# Altium PCB K210-01-(B049) 3C1A-140W(SD3934+SD59D31+SD59D31+SP1232FL) 外挂FTF屏1.3寸-V3-协议板.PcbDoc (part 1 of 2)
Units mm, origin at the board's own origin, x right, y up, seen from the top; angles counter-clockwise.
Board outline 62.01 x 27.28 mm, 4 copper layers (Top Layer, Mid-Layer 1, Mid-Layer 2, Bottom Layer); 105 components, 215 nets, 394 pads, 722 vias.
Unrouted connection lines stored in the file: 2.
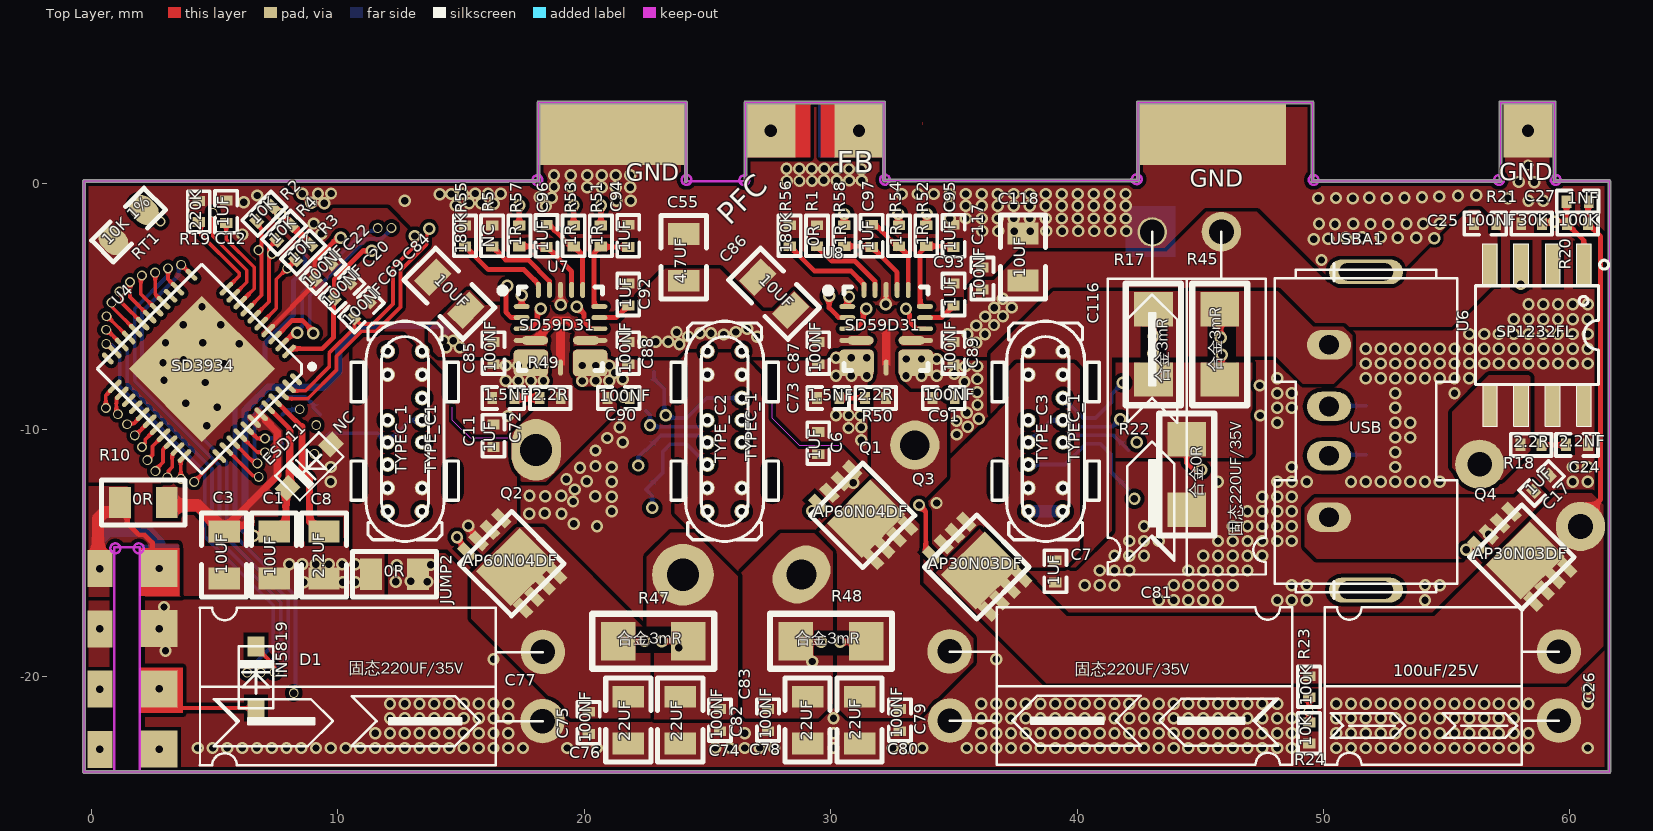
[diagram p0: Top Layer view]
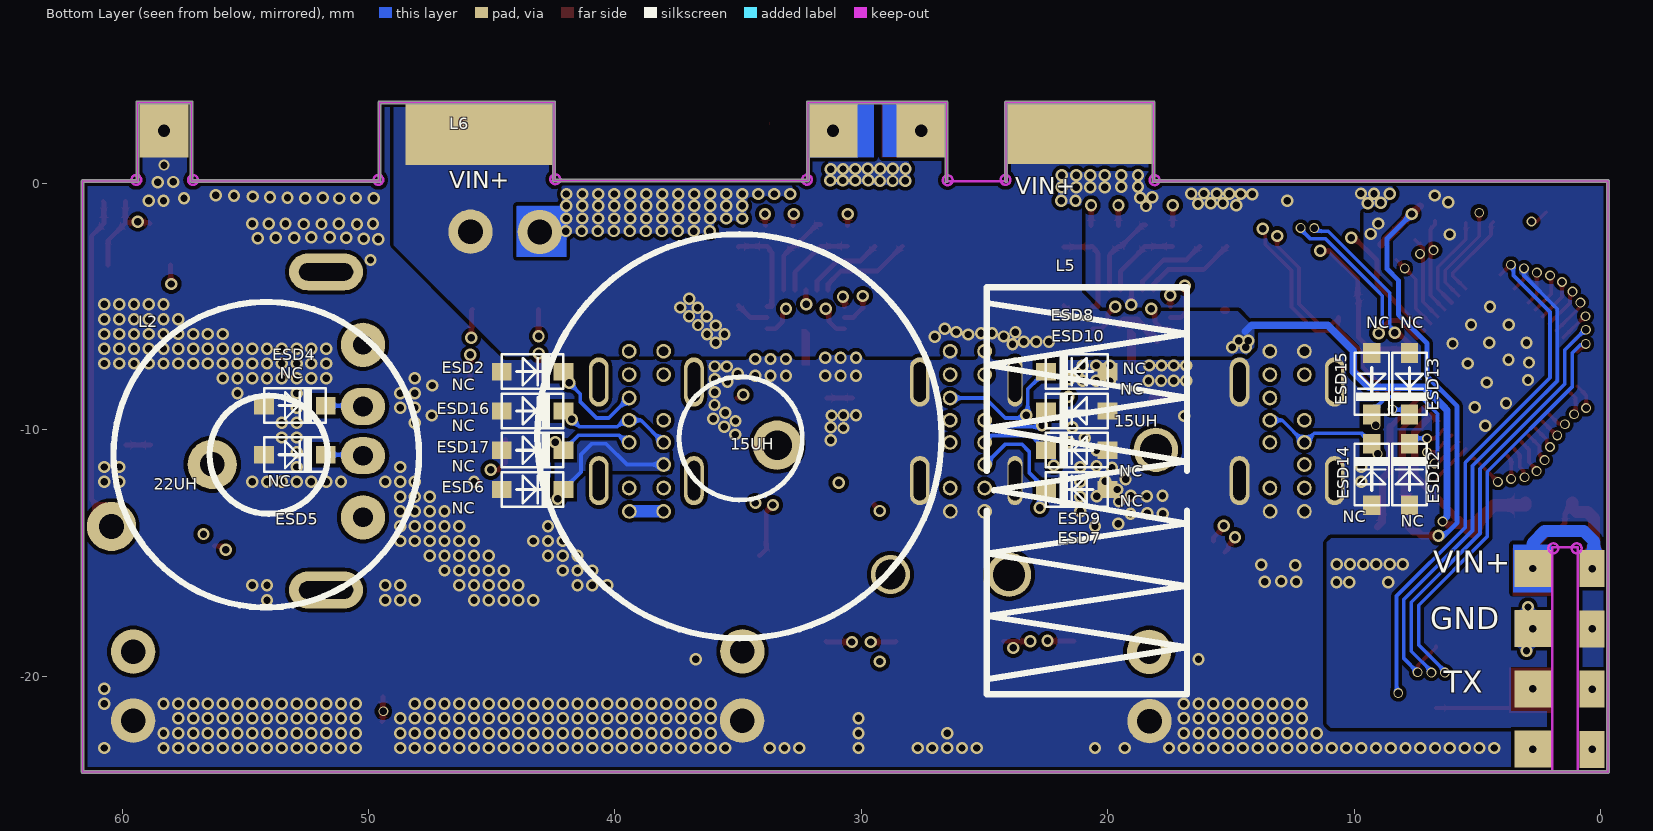
[diagram p1: Bottom Layer view, seen from below]
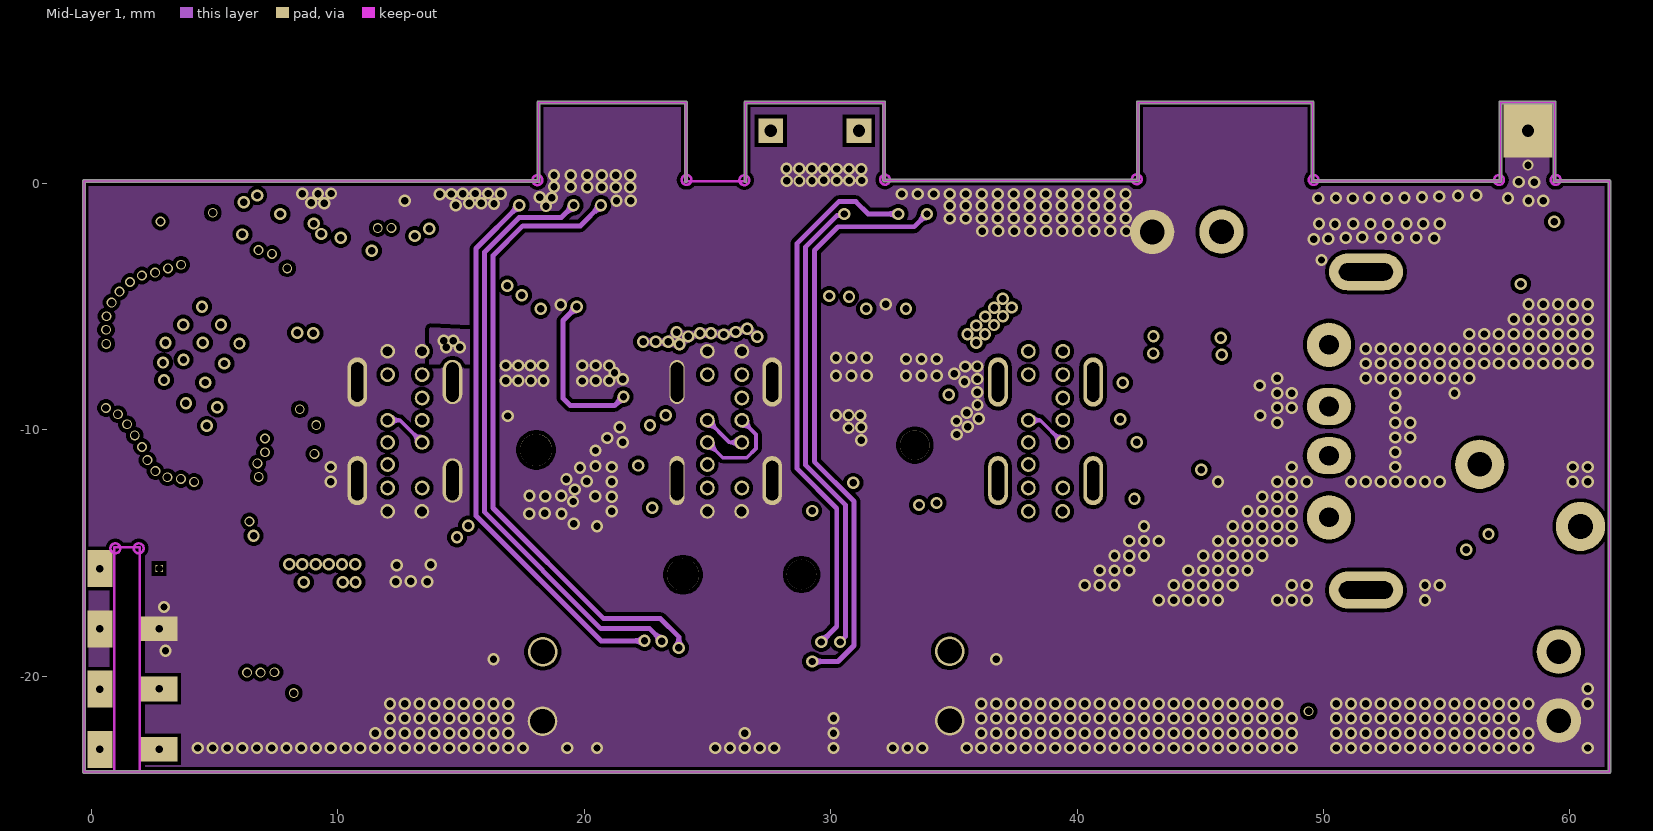
[diagram p2: Mid-Layer 1]
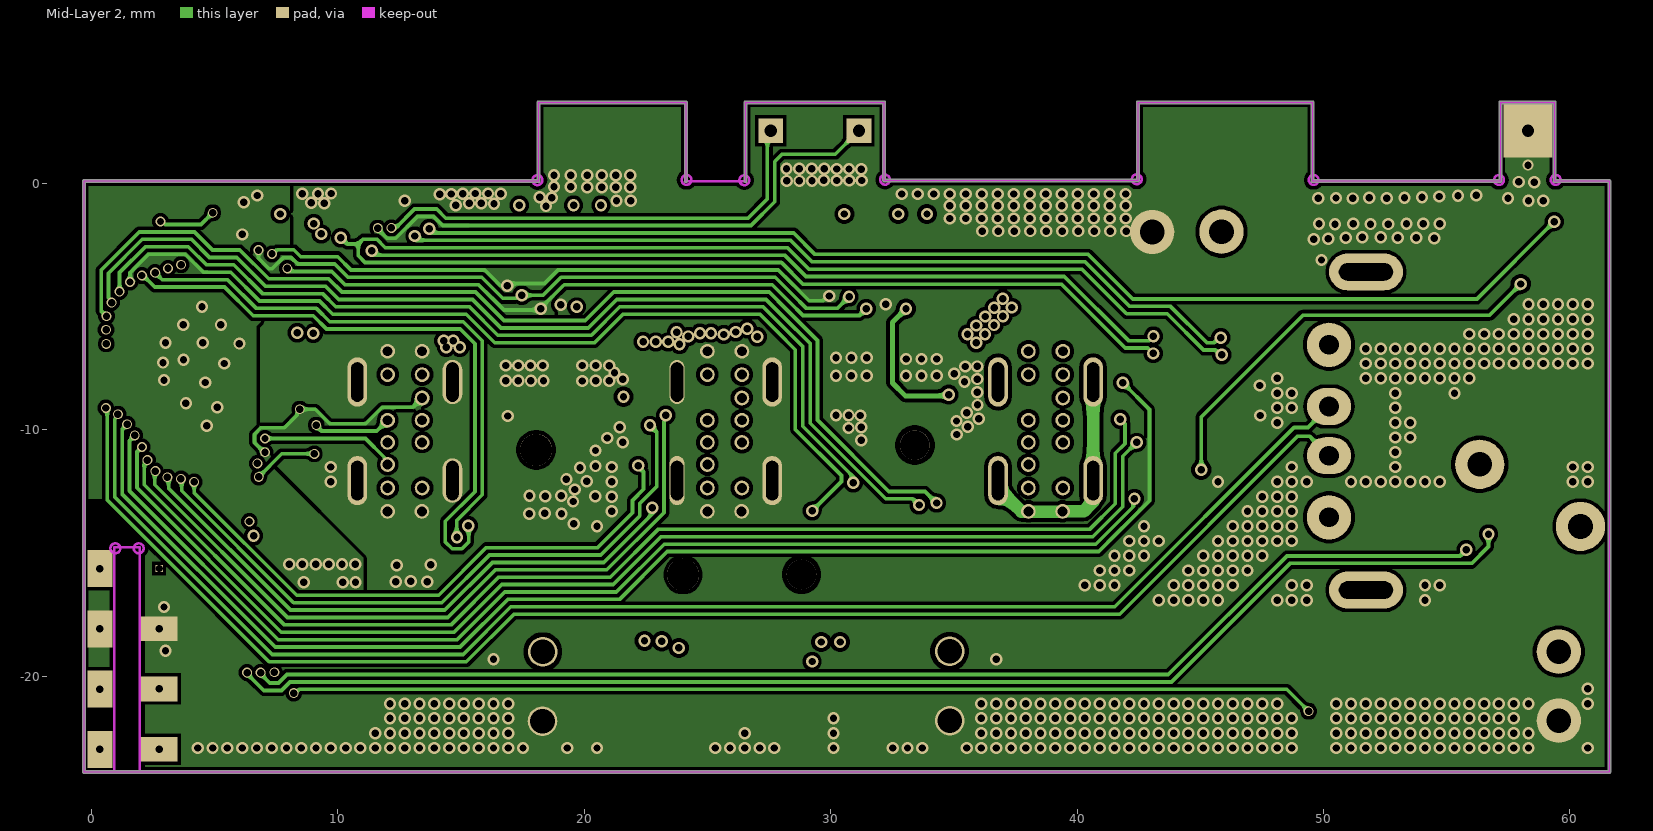
[diagram p3: Mid-Layer 2]

## Layer stack, top to bottom
Top Solder: solder mask 0.0102, Solder Resist, Dk 3.5
Top Layer: signal copper 0.0356
Dielectric 1: dielectric 0.32, FR-4, Dk 4.8
Mid-Layer 1: signal copper 0.0356
Dielectric2: dielectric 0.32, FR-4, Dk 4.8
Mid-Layer 2: signal copper 0.0356
Dielectric3: dielectric 0.32, FR-4, Dk 4.8
Bottom Layer: signal copper 0.0356
Bottom Solder: solder mask 0.0102, Solder Resist, Dk 3.5

## Board outline
-0.351,-22.405 cw(c-0.306,-22.382) -0.356,-22.382 -0.356,-15.199 cw(c-0.306,-15.199) -0.351,-15.177 -0.351,0.082 cw(c-0.3,0.082) -0.3,0.132 18.099,0.132 18.099,3.282 cw(c18.15,3.282) 18.15,3.332 24.125,3.332 cw(c24.125,3.282) 24.175,3.282 24.175,0.082 cw(c24.125,0.082) 24.074,0.082 24.074,3.231 18.2,3.231 18.2,0.082 cw(c18.15,0.082) 18.15,0.031 -0.25,0.031 -0.25,-23.843 61.549,-23.843 61.549,0.031 59.375,0.031 cw(c59.375,0.082) 59.324,0.082 59.324,3.231 57.225,3.231 57.225,0.082 cw(c57.175,0.082) 57.175,0.031 49.55,0.031 cw(c49.55,0.082) 49.499,0.082 49.499,3.231 42.525,3.231 42.525,0.107 cw(c42.475,0.107) 42.475,0.056 32.175,0.056 cw(c32.175,0.107) 32.124,0.107 32.124,3.231 26.6,3.231 26.6,0.082 cw(c26.55,0.082) 26.499,0.082 26.499,3.282 cw(c26.55,3.282) 26.55,3.332 32.175,3.332 cw(c32.175,3.282) 32.225,3.282 32.225,0.157 42.424,0.157 42.424,3.282 cw(c42.475,3.282) 42.475,3.332 49.55,3.332 cw(c49.55,3.282) 49.6,3.282 49.6,0.132 57.124,0.132 57.124,3.282 cw(c57.175,3.282) 57.175,3.332 59.375,3.332 cw(c59.375,3.282) 59.425,3.282 59.425,0.132 61.6,0.132 cw(c61.6,0.082) 61.65,0.082 61.65,-23.893 cw(c61.6,-23.893) 61.6,-23.944 -0.3,-23.944 cw(c-0.3,-23.893) -0.351,-23.893
cut-out: 0.925,-23.893 1.975,-23.893 1.975,-14.768 0.925,-14.768

## Design rules (kind name [scope] priority, off if disabled: settings)
Clearance [All] p1: gap=0.15 ignorepadtopadclearanceinfootprint=FALSE
ComponentClearance [All] p1: gap=0.05 collisioncheckmode=3 verticalgap=0.05 showdistances=FALSE
PlaneConnect [All] p1: planeconnectstyle=Direct reliefexpansion=0.508 reliefentries=4 reliefconductorwidth=0.254 reliefairgap=0.254
PolygonConnect [All] p1: connectstyle=Direct reliefconductorwidth=0.254 reliefentries=4 polygonreliefangle="90 Angle" airgapwidth=0.254
RoutingVias [All] p1: holewidth=0.3 width=0.4 viastyle="Through Hole" minholewidth=0.3 minwidth=0.4 maxholewidth=0.3 maxwidth=0.4
SolderMaskExpansion [All] p1: expansion=0.102 istentingtop=FALSE
Width [All] p1: maxlimit=1 minlimit=0.1 preferedwidth=0.15 minimp=50.000000 maximp=50.000000 favimp=50.000000
28 further rules are at their usual default settings.

## Classes and differential pairs
component class "B049-140W-3C1A 外挂FTF屏1.3寸": C1 C3 C6 C7 C8 C11 C12 C17 C20 C22 C24 C25 C26 C55 C69 C72 C73 C74 C75 C76 C77 C78 C79 C80 C81 C82 C83 C84 C85 C86 C87 C88 C89 C90 C91 C92 C93 C94 C95 C96 C97 C116 C117 C118 D1 ESD2 ESD4 ESD5 ESD6 ESD7 ESD8 ESD9 ESD10 ESD11 ESD12 ESD13 ESD14 ESD15 ESD16 ESD17 JUMP2 L2 L6 Q1 Q2 Q3 Q4 R1 R2 R3 R4 R5 R10 R17 R18 R19 R20 R21 R22 R45 R47 R48 R49 R50 R51 R52 R53 R54 R55 R56 R57 R58 RT1 TYPE_C2 TYPE_C3 U6 U7 U8 USBA1

## Components (designator, comment, footprint, x,y, rotation, side; value= is the part's Value field where it differs from the comment)
C1 "10UF" "C 0805_L" 7.42,-15.09 r90 top
C3 "10UF" "C 0805_L" 5.39,-15.09 r90 top
C6 "1UF" "C 0402_L" 29.5,-10.55 r270 top
C7 "1UF" "C 0402_L" 39.12,-15.75 r90 top
C8 "2.2UF" "C 0805_L" 9.44,-15.09 r90 top
C11 "1UF" "C 0402_L" 16.32,-10.25 r270 top
C12 "1UF" "C 0402_L" 5.47,-1.16 r270 top
C17 "1UF" "C 0402_L" 58.85,-12.18 r225 top
C20 "100NF" "C 0402_L" 10.176,-4.363 r45 top
C22 "100NF" "C 0402_L" 9.397,-3.583 r45 top
C24 "2.2NF" "C 0402_L" 60.29,-10.62 r180 top
C25 "100NF" "C 0402_L" 56.565,-1.643 r180 top
C26 "100uF/25V" 6*8W 59.55,-21.81 r180 top
C27 "1NF" "C 0402_L" 60.315,-0.75 r180 top (schematic designator C25)
C55 "4.7UF" "C 0805_L" 24.04,-3.01 r90 top
C69 "100NF" "C 0402_L" 10.96,-5.14 r45 top
C72 "1.5NF" "C 0402_L" 16.718,-8.718 r0 top
C73 "1.5NF" "C 0402_L" 29.9,-8.718 r0 top
C74 "22UF" "C 0805_L" 23.9,-21.79 r90 top
C75 "100NF" "C 0402_L" 20.18,-21.9 r90 top
C76 "22UF" "C 0805_L" 21.79,-21.79 r90 top
C77 "固态220UF/35V" 6*12W#1 16.41,-23.63 r180 top
C78 "22UF" "C 0805_L" 29.07,-21.79 r90 top
C79 "100NF" "C 0402_L" 32.81,-21.79 r90 top
C80 "22UF" "C 0805_L" 31.18,-21.79 r90 top
C81 "固态220UF/35V" 6*12W#2 36.74,-23.61 r0 top
C82 "100NF" "C 0402_L" 25.51,-21.79 r90 top
C83 "100NF" "C 0402_L" 27.46,-21.79 r90 top
C84 "10UF" "C 0805_L" 14.528,-4.488 r315 top
C85 "100NF" "C 0402_L" 16.318,-6.898 r90 top
C86 "10UF" "C 0805_L" 27.71,-4.488 r315 top
C87 "100NF" "C 0402_L" 29.5,-6.898 r90 top
C88 "100NF" "C 0402_L" 21.788,-6.898 r90 top
C89 "100NF" "C 0402_L" 34.99,-6.898 r90 top
C90 "100NF" "C 0402_L" 21.397,-8.718 r180 top
C91 "100NF" "C 0402_L" 34.59,-8.718 r180 top
C92 "1UF" "C 0402_L" 21.788,-4.519 r90 top
C93 "1UF" "C 0402_L" 34.99,-4.519 r90 top
C94 "1UF" "C 0402_L" 21.788,-2.14 r90 top
C95 "1UF" "C 0402_L" 34.99,-2.135 r90 top
C96 "1UF" "C 0402_L" 18.472,-2.14 r90 top
C97 "1UF" "C 0402_L" 31.665,-2.135 r90 top
C116 "固态220UF/35V" 6*12W#3 41.25,-3.88 r270 top locked
C117 "100NF" "C 0402_L" 36.16,-3.87 r270 top
C118 "10UF" "C 0805_L" 37.81,-3 r270 top
D1 "IN5819" SOD-323 6.68,-20.15 r90 top
ESD2 "NC" SOD-323 43.44,-7.65 r180 bottom
ESD4 "NC" SOD-323 53.09,-9.03 r180 bottom
ESD5 "NC" SOD-323 53.09,-11.02 r180 bottom
ESD6 "NC" SOD-323 43.44,-12.43 r180 bottom
ESD7 "NC" SOD-323 21.16,-12.43 r0 bottom
ESD8 "NC" SOD-323 21.16,-7.65 r0 bottom
ESD9 "NC" SOD-323 21.16,-10.837 r0 bottom
ESD10 "NC" SOD-323 21.16,-9.243 r0 bottom
ESD11 "NC" SOD-323 8.92,-11.42 r225 top
ESD12 "NC" SOD-323 7.76,-11.92 r90 bottom
ESD13 "NC" SOD-323 7.76,-8.04 r270 bottom
ESD14 "NC" SOD-323 9.29,-11.92 r90 bottom
ESD15 "NC" SOD-323 9.29,-8.04 r270 bottom
ESD16 "NC" SOD-323 43.44,-9.243 r180 bottom
ESD17 "NC" SOD-323 43.44,-10.837 r180 bottom
JUMP2 "0R" "R 0805_L" 12.3,-15.87 r0 top
L2 "22UH" 040125 54.05,-11.018 r270 bottom locked
L5 "15UH" IND-TH_L16.5-W8.5-P11.00-D1.0 20.85,-12.48 r180 bottom
L6 "15UH" 050125 34.95,-10.268 r225 bottom locked
Q1 "AP60N04DF" DFN3*3 31.511,-13.514 r135 top
Q2 "AP60N04DF" DFN3*3 17.271,-15.474 r135 top
Q3 "AP30N03DF" DFN3*3 36.143,-15.612 r135 top
Q4 "AP30N03DF" DFN3*3 58.264,-15.211 r135 top
R1 "0R" "R 0402_L" 29.448,-2.16 r90 top
R2 "10K" "R 0402_L" 7.04,-1.22 r225 top
R3 "10K" "R 0402_L" 8.62,-2.79 r225 top
R4 "10K" "R 0402_L" 7.84,-1.99 r225 top
R5 "NC" "R 0402_L" 16.267,-2.165 r90 top
R10 "0R" "R 0805_L" 2.11,-12.96 r0 top
R17 "合金3mR" "R 1206_L" 43.1,-6.518 r270 top
R18 "2.2R" "R 0402_L" 58.4,-10.62 r0 top
R19 "220K" "R 0402_L" 4.36,-1.13 r270 top
R20 "100K" "R 0402_L" 60.29,-1.643 r0 top
R21 "30K" "R 0402_L" 58.475,-1.643 r180 top
R22 "合金0R" "R 1206_L" 44.45,-11.85 r90 top
R23 "100K" "R 0402_L" 49.42,-20.41 r270 top (schematic designator R20)
R24 "10K" "R 0402_L" 49.42,-22.29 r270 top (schematic designator R21)
R45 "合金3mR" "R 1206_L" 45.79,-6.518 r270 top
R47 "合金3mR" "R 1206_L" 22.78,-18.59 r0 top
R48 "合金3mR" "R 1206_L" 30.04,-18.59 r180 top
R49 "2.2R" "R 0402_L" 18.648,-8.718 r180 top
R50 "2.2R" "R 0402_L" 31.85,-8.718 r180 top
R51 "1R" "R 0402_L" 20.678,-2.115 r270 top
R52 "1R" "R 0402_L" 33.882,-2.11 r270 top
R53 "1R" "R 0402_L" 19.575,-2.115 r270 top
R54 "1R" "R 0402_L" 32.773,-2.11 r270 top
R55 "180K" "R 0402_L" 15.164,-2.165 r90 top
R56 "180K" "R 0402_L" 28.34,-2.16 r90 top
R57 "1R" "R 0402_L" 17.37,-2.115 r270 top
R58 "1R" "R 0402_L" 30.557,-2.11 r270 top
RT1 "10K 1%" NTC1 1.54,-1.68 r225 top
TYPE_C1 "TYPEC_1" "TP-14pin 180°"#1 12.725,-10.07 r90 top locked
TYPE_C2 "TYPEC_1" "TP-14pin 180°"#2 25.7,-10.07 r90 top locked
TYPE_C3 "TYPEC_1" "TP-14pin 180°"#3 38.725,-10.07 r90 top locked
U4 "SD3934" QFN52L6*6 4.41,-8.28 r135 top
U6 "SP1232FL" SOP8 58.74,-6.19 r270 top
U7 "SD59D31" SD59D31_QFN16 19.088,-6.038 r180 top
U8 "SD59D31" SD59D31_QFN16 32.3,-6.038 r180 top
USBA1 "USB" "USB180 10mm" 51.725,-10.061 r270 top locked

## Footprints (in the part's own frame and the unit in brackets; to place one, negate y for a bottom-side part, rotate by r counter-clockwise, add the part's x,y. Pads: shape width x height; smd on the part's side, far side on the other; paste and mask are expansions set on the pad)
6*8W [mm]
  round 1.8 hole 1: 1(0,-2.8) 2(0,0)
  silkscreen extent 0,-4.6 9.5,1.8
6*12W#1 [mm]
  round 1.8 / inner round 1.2 / far side round 1.8 hole 1: 1(-1.91,-4.61) 2(-1.9,-1.8)
  silkscreen extent -1.91,-6.4 12,0
6*12W#2 [mm]
  round 1.8 / inner round 1.2 / far side round 1.8 hole 1: 1(-1.91,4.61) 2(-1.9,1.8)
  silkscreen extent -1.91,0 12,6.4
6*12W#3 [mm]
  round 1.6 / inner round 1.8 / far side round 1.8 hole 1: 1(-1.91,4.61)
  round 1.2 / inner round 1.8 / far side round 1.8 hole 1: 2(-1.9,1.8)
  silkscreen extent -1.91,0 12,6.4
040125 [mm]
  round 2 hole 1: 1(0.392,-2.29) 2(2.912,-6.38)
  silkscreen extent -6.2,-6.3 6.2,6.1
050125 [mm]
  round 2 / inner round 1.2 / far side round 2 hole 1.2: 1(1.338,0.826)
  round 1.6 / inner round 1.2 / far side oval 2.5x2 hole 1.2: 2(8.303,0.366)
  silkscreen extent -8.2,-8.2 8.2,8.2
"C 0402_L" [mm] "无极性贴片电容         淘宝ID:黄晶宝石"
  rect 0.4x0.5 smd: 1(-0.45,0) 2(0.45,0)
  silkscreen extent -0.85,-0.45 0.85,0.45, body extent -0.5,-0.26 0.5,0.26, height 0.53
"C 0805_L" [mil] "无极性贴片电容                                        淘宝ID:黄晶宝石"
  rect 35x50 smd: 1(-37.4,0) 2(37.4,0)
  silkscreen extent -67,-36 67,36, body extent -39,-24 39,24, height 20
DFN3*3 [mm]
  rect 0.8x0.4 smd: D(-1.425,-0.225) D(-1.425,-0.875) D(-1.425,0.425) D(-1.425,1.075) G(1.775,1.075) S(1.775,-0.875) S(1.775,0.425) S(1.775,-0.225)
  rect 2x2.5 smd: D(-0.025,0.125)
  silkscreen extent -1.33,-1.38 1.67,1.62, body extent -1.42,-1.43 1.78,1.67, height 0.8
IND-TH_L16.5-W8.5-P11.00-D1.0 [mm]
  round 1.8 / inner round 1.3 / far side round 2.5 hole 1.3: 1(-3.16,-3.41)
  round 1.8 / inner round 1.3 / far side oval 2x2.5 hole 1.3: 2(2.8,1.66)
  silkscreen extent -4.06,-8.25 4.06,8.25
NTC1 [mm]
  oval 1x1.3 smd: 1(-0.84,0) 2(0.91,0)
  silkscreen extent -1.47,-0.62 1.53,0.62
QFN52L6*6 [mm]
  rect 4.2x4.2 smd: 0(0.47,-0.58)
  oval 0.2x0.6 on Top Overlay: 1(-1.93,-3.58) 13(2.87,-3.58) 27(2.87,2.42) 39(-1.93,2.42)
  oval 0.2x0.7 smd: 2(-1.53,-3.58) 3(-1.13,-3.58) 4(-0.73,-3.58) 5(-0.33,-3.58) 6(0.07,-3.58) 7(0.47,-3.58) 8(0.87,-3.58) 9(1.27,-3.58) 10(1.67,-3.58) 11(2.07,-3.58) 28(2.47,2.42) 29(2.07,2.42) 30(1.67,2.42) 31(1.27,2.42) 32(0.87,2.42) 33(0.47,2.42) 34(0.07,2.42) 35(-0.33,2.42) 36(-0.73,2.42) 37(-1.13,2.42) 38(-1.53,2.42)
  oval 0.2x0.7 on Top Overlay: 12(2.47,-3.58)
  oval 0.6x0.2 smd: 14(3.47,-2.98) 26(3.47,1.82) 52(-2.53,-2.98)
  oval 0.7x0.2 on Top Overlay: 15(3.47,-2.58)
  oval 0.7x0.2 smd: 16(3.47,-2.18) 17(3.47,-1.78) 18(3.47,-1.38) 19(3.47,-0.98) 20(3.47,-0.58) 21(3.47,-0.18) 22(3.47,0.22) 23(3.47,0.62) 24(3.47,1.02) 25(3.47,1.42) 41(-2.53,1.42) 42(-2.53,1.02) 43(-2.53,0.62) 44(-2.53,0.22) 45(-2.53,-0.18) 46(-2.53,-0.58) 47(-2.53,-0.98) 48(-2.53,-1.38) 49(-2.53,-1.78) 50(-2.53,-2.18) 51(-2.53,-2.58)
  oval 0.6x0.2 on Top Overlay: 40(-2.53,1.82)
  silkscreen extent -2.73,-3.91 3.47,2.42, body extent -2.58,-3.58 3.42,2.42, height 0.9
"R 0402_L" [mm] "1/16W贴片电阻     淘宝ID:黄晶宝石"
  rect 0.4x0.5 smd: 1(-0.4,0) 2(0.45,0)
  silkscreen extent -0.8,-0.45 0.85,0.45, body extent -0.5,-0.25 0.5,0.25, height 0.3
"R 0805_L" [mil] "1/8W贴片电阻"
  rect 35x50 smd: 1(-37.4,0) 2(37.4,0)
  silkscreen extent -67,-36 67,36, body extent -39,-25 39,25, height 20
"R 1206_L" [mil] "1/4W贴片电阻"
  rect 55x62 smd: 1(-55.12,0) 2(57.09,0)
  silkscreen extent -96,-44 98,44, body extent -63,-31 63,32, height 22
SD59D31_QFN16 [mm]
  oval 0.65x0.2 smd: 1(1.623,-1.031) 2(1.623,-0.581) 3(1.623,-0.131) 4(1.623,0.344) 8(-1.527,0.344) 9(-1.527,-0.131) 10(-1.527,-0.581) 11(-1.527,-1.031)
  oval 1.075x0.35 smd: 4(1.089,0.344) 8(-0.994,0.344)
  rrect30% 1.4x1.075 smd: 5(1.248,1.254) 7(-1.152,1.254)
  oval 0.2x0.65 smd: 6(0.048,1.444) 12(-0.852,-1.706) 13(-0.402,-1.706) 14(0.048,-1.706) 15(0.498,-1.706) 16(0.948,-1.706)
  Top Layer region: 0.223,1.368 -0.127,1.368 -0.127,0.047 0.223,0.047
  Top Layer region: 0.223,0.047 0.058,-0.118 -0.127,-0.118 -0.127,0.047
  silkscreen extent -1.65,-1.83 2.52,1.57, body extent -1.48,-1.66 1.62,1.44, height 0.85
SOD-323 [mm]
  rect 0.8x0.7 smd: 1(-1.15,0) 2(1.35,0)
  silkscreen extent -1.15,-0.7 1.35,0.7, body extent -1.19,-0.65 1.41,0.65, height 1
SOP8 [mm]
  rect 1.7x0.6 smd: 1(-2.875,1.83) 2(-2.875,0.56) 3(-2.875,-0.71) 4(-2.875,-1.98) 5(2.825,-1.98) 6(2.825,-0.71) 7(2.825,0.56) 8(2.825,1.83)
  silkscreen extent -3.73,-2.58 3.68,2.83, body extent -3.01,-2.52 2.99,2.38, height 1.7
"TP-14pin 180°"#1 [mm]
  round 0.6 hole 0.4: A1(-3.25,0.7) A4(-2.3,0.7) A5(-1.35,0.7) A6(-0.45,0.7) A7(0.45,0.7) A9(2.3,0.7) A12(3.25,0.7) B1(3.25,-0.7) B4(2.3,-0.7) B5(1.35,-0.7) B6(0.45,-0.7) B7(-0.45,-0.7) B9(-2.3,-0.7) B12(-3.25,-0.69)
  oval 1.6x0.6 / inner oval 1.8x0.8 / far side oval 2x0.8 hole 0.5 slot 1.6 at 0 deg: ""(-2,-1.93) ""(2,-1.93)
  oval 1.6x0.6 / inner oval 2x0.8 / far side oval 2x0.8 hole 0.5 slot 1.6 at 0 deg: ""(-2,1.93) ""(2,1.93)
  silkscreen extent -4.46,-2.18 4.47,2.18, body extent -4.5,-1.98 4.5,2.02, height 10
"TP-14pin 180°"#2 [mm]
  round 0.6 hole 0.4: A1(-3.25,0.7) A4(-2.3,0.7) A5(-1.35,0.7) A6(-0.45,0.7) A7(0.45,0.7) A9(2.3,0.7) A12(3.25,0.7) B1(3.25,-0.7) B4(2.3,-0.7) B5(1.35,-0.7) B6(0.45,-0.7) B7(-0.45,-0.7) B9(-2.3,-0.7) B12(-3.25,-0.69)
  oval 1.6x0.6 / inner oval 2x0.8 / far side oval 2x0.8 hole 0.5 slot 1.6 at 0 deg: ""(-2,-1.93) ""(2,-1.93)
  oval 1.6x0.6 / inner oval 2x0.6 / far side oval 2x0.6 hole 0.5 slot 1.6 at 0 deg: ""(-2,1.93)
  oval 1.6x0.6 / inner oval 1.8x0.6 / far side oval 2x0.6 hole 0.5 slot 1.6 at 0 deg: ""(2,1.93)
  silkscreen extent -4.46,-2.18 4.47,2.18, body extent -4.5,-1.98 4.5,2.02, height 10
"TP-14pin 180°"#3 [mm]
  round 0.6 hole 0.4: A1(-3.25,0.7) A4(-2.3,0.7) A5(-1.35,0.7) A6(-0.45,0.7) A7(0.45,0.7) A9(2.3,0.7) A12(3.25,0.7) B1(3.25,-0.7) B4(2.3,-0.7) B5(1.35,-0.7) B6(0.45,-0.7) B7(-0.45,-0.7) B9(-2.3,-0.7) B12(-3.25,-0.69)
  oval 1.6x0.6 / inner oval 2x0.8 / far side oval 2x0.8 hole 0.5 slot 1.6 at 0 deg: ""(-2,-1.93) ""(-2,1.93) ""(2,-1.93) ""(2,1.93)
  silkscreen extent -4.46,-2.18 4.47,2.18, body extent -4.5,-1.98 4.5,2.02, height 10
"USB180 10mm" [mm]
  oval 1.2x1.8 / inner round 1.8 / far side round 1.8 hole 0.8: 1(3.5,-1.5) 4(-3.5,-1.5)
  oval 1.2x1.8 / inner oval 1.5x1.8 / far side oval 1.5x1.8 hole 0.8: 2(1,-1.5) 3(-1,-1.5)
  oval 1x3 / inner oval 1.5x3 / far side oval 1.5x3 hole 0.7 slot 2.2 at 90 deg: ""(-6.46,0) ""(6.45,0)
  silkscreen extent -6.8,-3.7 6.8,3.7, body extent -6.6,-3.02 6.6,2.98, height 10

## Part data
C1: library part C-CC, "贴片电容：10UF/10V-X5R-0805", PART NUMBER=003-, TOLERANCE=+-??%, VOLTAGE RATING=??V, LatestRevisionDate=17-Jul-2002, LatestRevisionNote="Re-released for DXP Platform.", PackageDescription="Radial Cap, Thru-Hole; 2 Leads; 0.3 in Pin Spacing", PackageReference=RAD-0.3, PART DESC="CERAMIC CAP", PCB DECAL=CCV5S, Published=8-Jun-2000, Publisher="Altium Limited"
C3: library part C-CC, "贴片电容：10UF/50V-X5R-0805", PART NUMBER=003-, TOLERANCE=+-??%, VOLTAGE RATING=??V, LatestRevisionDate=17-Jul-2002, LatestRevisionNote="Re-released for DXP Platform.", PackageDescription="Radial Cap, Thru-Hole; 2 Leads; 0.3 in Pin Spacing", PackageReference=RAD-0.3, PART DESC="CERAMIC CAP", PCB DECAL=CCV5S, Published=8-Jun-2000, Publisher="Altium Limited"
C6 C7 C11 C12 C17 C96 C97: library part C-CC, "贴片电容：1UF/50V-X7R-0402", PART NUMBER=003-, TOLERANCE=+-??%, VOLTAGE RATING=??V, PART DESC="CERAMIC CAP", PCB DECAL=CCV5S
  C6 C7 C11 C17 C96 C97: LatestRevisionDate=17-Jul-2002, LatestRevisionNote="Re-released for DXP Platform.", PackageDescription="Radial Cap, Thru-Hole; 2 Leads; 0.3 in Pin Spacing", PackageReference=RAD-0.3, Published=8-Jun-2000, Publisher="Altium Limited"
C8: library part C-CC, "贴片电容：2.2UF/10V-X5R-0805", PART NUMBER=003-, TOLERANCE=+-??%, VOLTAGE RATING=??V, LatestRevisionDate=17-Jul-2002, LatestRevisionNote="Re-released for DXP Platform.", PackageDescription="Radial Cap, Thru-Hole; 2 Leads; 0.3 in Pin Spacing", PackageReference=RAD-0.3, PART DESC="CERAMIC CAP", PCB DECAL=CCV5S, Published=8-Jun-2000, Publisher="Altium Limited"
C20 C22 C69 C85 C87 C88 C89 C90 C91 C117: library part C-CC, "贴片电容：100NF/50V-X7R-0402", PART NUMBER=003-, TOLERANCE=+-??%, VOLTAGE RATING=??V, PART DESC="CERAMIC CAP", PCB DECAL=CCV5S
  C20 C22 C69 C85 C87 C88 C89 C90 C91: LatestRevisionDate=17-Jul-2002, LatestRevisionNote="Re-released for DXP Platform.", PackageDescription="Radial Cap, Thru-Hole; 2 Leads; 0.3 in Pin Spacing", PackageReference=RAD-0.3, Published=8-Jun-2000, Publisher="Altium Limited"
C24: library part Cap, "贴片电容：2.2NF/50V-X7R-0402", LatestRevisionDate=17-Jul-2002, LatestRevisionNote="Re-released for DXP Platform.", PackageDescription="Radial Cap, Thru-Hole; 2 Leads; 0.3 in Pin Spacing", PackageReference=RAD-0.3, Published=8-Jun-2000, Publisher="Altium Limited"
C25: library part Cap, "贴片电容：100NF/50V-X7R-0402", LatestRevisionDate=17-Jul-2002, LatestRevisionNote="Re-released for DXP Platform.", PackageDescription="Radial Cap, Thru-Hole; 2 Leads; 0.3 in Pin Spacing", PackageReference=RAD-0.3, Published=8-Jun-2000, Publisher="Altium Limited"
C26: library part "Cap Pol2", "电解电容：100UF/25V 6.3*8mm", LatestRevisionDate=17-Jul-2002, LatestRevisionNote="Re-released for DXP Platform.", PackageDescription="Polarized Capacitor; 2 Leads", PackageReference=POLAR0.8, Published=8-Jun-2000, Publisher="Altium Limited"
C27: library part Cap, "贴片电容：1NF/50V-X7R-0402", LatestRevisionDate=17-Jul-2002, LatestRevisionNote="Re-released for DXP Platform.", PackageDescription="Radial Cap, Thru-Hole; 2 Leads; 0.3 in Pin Spacing", PackageReference=RAD-0.3, Published=8-Jun-2000, Publisher="Altium Limited"
C55: library part C-CC, "贴片电容：4.7UF/25V-X5R-0805", PART NUMBER=003-, TOLERANCE=+-??%, VOLTAGE RATING=??V, LatestRevisionDate=17-Jul-2002, LatestRevisionNote="Re-released for DXP Platform.", PackageDescription="Radial Cap, Thru-Hole; 2 Leads; 0.3 in Pin Spacing", PackageReference=RAD-0.3, PART DESC="CERAMIC CAP", PCB DECAL=CCV5S, Published=8-Jun-2000, Publisher="Altium Limited"
C72 C73: library part C-CC, "贴片电容：1.5NF/50V-X7R-0402", PART NUMBER=003-, TOLERANCE=+-??%, VOLTAGE RATING=??V, PART DESC="CERAMIC CAP", PCB DECAL=CCV5S
C74 C76 C78 C80: library part C-CC, "22UF/25V-X5R-0805", PART NUMBER=003-, TOLERANCE=+-??%, VOLTAGE RATING=??V, LatestRevisionDate=17-Jul-2002, LatestRevisionNote="Re-released for DXP Platform.", PackageDescription="Radial Cap, Thru-Hole; 2 Leads; 0.3 in Pin Spacing", PackageReference=RAD-0.3, PART DESC="CERAMIC CAP", PCB DECAL=CCV5S, Published=8-Jun-2000, Publisher="Altium Limited"
C75 C79 C82 C83: library part C-CC, "贴片电容：100NF/25V-X7R-0402", PART NUMBER=003-, TOLERANCE=+-??%, VOLTAGE RATING=??V, LatestRevisionDate=17-Jul-2002, LatestRevisionNote="Re-released for DXP Platform.", PackageDescription="Radial Cap, Thru-Hole; 2 Leads; 0.3 in Pin Spacing", PackageReference=RAD-0.3, PART DESC="CERAMIC CAP", PCB DECAL=CCV5S, Published=8-Jun-2000, Publisher="Altium Limited"
C77 C81 C116: library part C-CE, "插件固态电容：220UF/35V -6*12", PCB DECAL=CE6X11
C84 C86: library part C-CC, "贴片电容：10UF/25V-X7R-0805", PART NUMBER=003-, TOLERANCE=+-??%, VOLTAGE RATING=??V, LatestRevisionDate=17-Jul-2002, LatestRevisionNote="Re-released for DXP Platform.", PackageDescription="Radial Cap, Thru-Hole; 2 Leads; 0.3 in Pin Spacing", PackageReference=RAD-0.3, PART DESC="CERAMIC CAP", PCB DECAL=CCV5S, Published=8-Jun-2000, Publisher="Altium Limited"
C92 C93: library part C-CC, "贴片电容：1UF/10V-X7R-0402", PART NUMBER=003-, TOLERANCE=+-??%, VOLTAGE RATING=??V, LatestRevisionDate=17-Jul-2002, LatestRevisionNote="Re-released for DXP Platform.", PackageDescription="Radial Cap, Thru-Hole; 2 Leads; 0.3 in Pin Spacing", PackageReference=RAD-0.3, PART DESC="CERAMIC CAP", PCB DECAL=CCV5S, Published=8-Jun-2000, Publisher="Altium Limited"
C94 C95: library part C-CC, "贴片电容：1UF/25V-X7R-0402", PART NUMBER=003-, TOLERANCE=+-??%, VOLTAGE RATING=??V, LatestRevisionDate=17-Jul-2002, LatestRevisionNote="Re-released for DXP Platform.", PackageDescription="Radial Cap, Thru-Hole; 2 Leads; 0.3 in Pin Spacing", PackageReference=RAD-0.3, PART DESC="CERAMIC CAP", PCB DECAL=CCV5S, Published=8-Jun-2000, Publisher="Altium Limited"
C118: library part C-CC, "贴片电容：10UF/50V-X7R-0805", PART NUMBER=003-, TOLERANCE=+-??%, VOLTAGE RATING=??V, PART DESC="CERAMIC CAP", PCB DECAL=CCV5S
D1: library part D1
ESD2 ESD4 ESD5 ESD6 ESD7 ESD8 ESD9 ESD10 ESD11 ESD12 ESD13 ESD14 ESD15 ESD16 ESD17: library part ESD1
  ESD2 ESD6 ESD11 ESD16 ESD17: PCB DECAL=0603-CAP
  ESD4 ESD5 ESD7 ESD8 ESD9 ESD10 ESD12 ESD13 ESD14 ESD15: PCB DECAL=DIODE\SMD
JUMP2: library part J, "贴片电阻：0R-0805-F", PCB DECAL=JP5
L2: library part L, "磁环电感：040125 22UH 0.7线径 立式加套管"
L6: library part IND-UPRIGHT, "磁环电感：050125-15UH-1.2线径卧套", Code_IEC=1005, Code_JEITA=0402, LatestRevisionDate=29-May-2009, LatestRevisionNote="IPC-7351 Footprint Added.", PackageDescription="Chip Inductor", PackageReference=0402-A, PCB DECAL=FC5T5A, Published=8-Jun-2000, Publisher="Altium Limited"
Q1 Q2: library part NMOS, "贴片MOS:AP60N04DF-3*3", PCB DECAL=DFN5_6
Q3 Q4: library part NMOS, "贴片MOS:AP30N03DF-3*3", PCB DECAL=DFN5_6
R1: library part RES, "贴片电阻：0R-0402-F", Manufacturer="Generic Components", Class=Passive, PCB DECAL=0603-RES, Published=08/06/2000, Publisher="Altium Hobart Technology Centre", SubClass=Resistor
R2 R3 R4: library part RES, "贴片电阻：10K-0402-F", Manufacturer="Generic Components", Class=Passive, PCB DECAL=0603-RES, Published=08/06/2000, Publisher="Altium Hobart Technology Centre", SubClass=Resistor
R5: library part RES, Manufacturer="Generic Components", Class=Passive, PCB DECAL=0603-RES, Published=08/06/2000, Publisher="Altium Hobart Technology Centre", SubClass=Resistor
R10: library part RES, "贴片电阻：0R-0805-F", Manufacturer="Generic Components", Class=Passive, PCB DECAL=0603-RES, Published=08/06/2000, Publisher="Altium Hobart Technology Centre", SubClass=Resistor
R17 R45 R47 R48: library part RES, "贴片合金电阻：3mR-1206-F", Manufacturer="Generic Components", Class=Passive, PCB DECAL=0603-RES, Published=08/06/2000, Publisher="Altium Hobart Technology Centre", SubClass=Resistor
R18: library part Res1, "贴片电阻：2.2R-0402-F", LatestRevisionDate=17-Jul-2002, LatestRevisionNote="Re-released for DXP Platform.", PackageDescription="Axial Device, Thru-Hole; 2 Leads; 0.3 in Pin Spacing", PackageReference=AXIAL-0.3, Published=8-Jun-2000, Publisher="Altium Limited"
R19: library part RES, "贴片电阻：220K-0402-F", Manufacturer="Generic Components", Class=Passive, PCB DECAL=0603-RES, Published=08/06/2000, Publisher="Altium Hobart Technology Centre", SubClass=Resistor
R20 R23: library part Res1, "贴片电阻：100K-0402-F", LatestRevisionDate=17-Jul-2002, LatestRevisionNote="Re-released for DXP Platform.", PackageDescription="Axial Device, Thru-Hole; 2 Leads; 0.3 in Pin Spacing", PackageReference=AXIAL-0.3, Published=8-Jun-2000, Publisher="Altium Limited"
R21: library part Res1, "贴片电阻：30K-0402-F", LatestRevisionDate=17-Jul-2002, LatestRevisionNote="Re-released for DXP Platform.", PackageDescription="Axial Device, Thru-Hole; 2 Leads; 0.3 in Pin Spacing", PackageReference=AXIAL-0.3, Published=8-Jun-2000, Publisher="Altium Limited"
R22: library part Res1, "贴片电阻：合金0R-1206-F", LatestRevisionDate=17-Jul-2002, LatestRevisionNote="Re-released for DXP Platform.", PackageDescription="Axial Device, Thru-Hole; 2 Leads; 0.3 in Pin Spacing", PackageReference=AXIAL-0.3, Published=8-Jun-2000, Publisher="Altium Limited"
R24: library part Res1, "贴片电阻：10K-0402-F", LatestRevisionDate=17-Jul-2002, LatestRevisionNote="Re-released for DXP Platform.", PackageDescription="Axial Device, Thru-Hole; 2 Leads; 0.3 in Pin Spacing", PackageReference=AXIAL-0.3, Published=8-Jun-2000, Publisher="Altium Limited"
R49 R50: library part RES, "贴片电阻：2.2R-0402-F", Manufacturer="Generic Components", Class=Passive, PCB DECAL=0603-RES, Published=08/06/2000, Publisher="Altium Hobart Technology Centre", SubClass=Resistor
R51 R52 R53 R54 R57 R58: library part RES, "贴片电阻：1R-0402,+/-1% SMD", Manufacturer="Generic Components", Class=Passive, PCB DECAL=0603-RES, Published=08/06/2000, Publisher="Altium Hobart Technology Centre", SubClass=Resistor
R55 R56: library part RES, "贴片电阻：180K-0402-F", Manufacturer="Generic Components", Class=Passive, PCB DECAL=0603-RES, Published=08/06/2000, Publisher="Altium Hobart Technology Centre", SubClass=Resistor
RT1: library part RES-A, "插件NTC热敏电阻：10K 1% 3950 L：60mm", PCB DECAL=R.AI-6\1(1/8W)
U4: "贴片IC：SD3934-QFN52L6*6", PCB DECAL=QFN52-0.4
U6: library part SP1233FL, "贴片IC：SP1232F-SOP8"
U7 U8: library part SD59D31_QFN16, "贴片IC：SD59D31-QFN3x3_16", PCB DECAL=QFN16_3X3
TYPE_C1 TYPE_C2 TYPE_C3: PCB DECAL=TYPEC

## Free pads (board coordinates)
  rect 1x1.5 hole 0.3 mask+0.102: 2(0.35,-22.973) 2(0.35,-20.53) 2(0.35,-18.086) 2(0.35,-15.643)
  rect 1.5x1.5 / inner rect 1.5x1 / far side rect 1.5x1.5 hole 0.3 mask+0.102: 2(2.75,-22.968) 2(2.75,-20.524) 2(2.75,-18.08)
  rect 1.5x1.5 / inner rect 0.3x0.3 / far side rect 1.5x1.5 hole 0.3 mask+0.102: 2(2.75,-15.636)
  rect 2x2.2 / inner rect 1x1 / far side rect 2x2.2 hole 0.5 mask+0.102: 2(27.575,2.132) 2(31.15,2.132)
  rect 2x2.2 hole 0.5 mask+0.102: 2(58.3,2.132)
  rect 6x2.5 smd far side mask+0.102: GND(21.08,2.02) GND(45.51,1.99)
  rect 6x2.5 smd mask+0.102: GND(21.15,1.982) GND(45.475,1.982)

## Via types
v1: diameter 0.5, hole 0.3, Top Layer to Bottom Layer, tented both sides, 681 vias
v2: diameter 0.4, hole 0.3, Top Layer to Bottom Layer, tented both sides, 40 vias
v3: diameter 0.45, hole 0.3, Top Layer to Bottom Layer, tented both sides, 1 vias

## Nets (pads, with @x,y where several pads share a name; then routed paths per layer and width w, separated by ;. In a path a pad name is that pad's centre, name@x,y a point inside that pad or via, vN(x,y) a via of type N, cw(c..) or ccw(c..) an arc to the next point about the centre after c; other vN are vias at no path point)
AD1: R23.2 R24.1 U4.14 | length 63.9
  Top Layer w0.15: v2(3.642,-3.31) 3.655,-3.31 U4.14@4.063,-3.719
  Top Layer w0.2: R23.2@49.42,-20.86 49.42,-21.81 R24.1@49.46,-21.85
  Mid-Layer 2 w0.15: v2(8.213,-20.693) 8.281,-20.693 8.434,-20.54 48.508,-20.54 v2(49.399,-21.431)
  Bottom Layer w0.15: v2(3.642,-3.31) 3.538,-3.414 3.538,-3.746 2.06,-5.224 2.06,-7.9 5.5,-11.34 5.5,-13.97 8.286,-16.756 8.286,-20.62 v2(8.213,-20.693)
AGND: C1.1 C3.1 C8.1 C12.1 C20.2 C22.2 C69.2 JUMP2.1 R19.1 RT1.2 U4.0
  other v1: 8.62,-16.2 10.2,-16.2 10.72,-16.2 8.03,-15.465 8.566,-15.465 9.102,-15.465 9.638,-15.465 10.174,-15.465 10.71,-15.465 4.69,-9.85 5.11,-9.1 3.84,-8.93 4.62,-8.09 2.95,-7.99 5.4,-7.32 2.91,-7.28 3.74,-7.16 6.01,-6.51 3.01,-6.47 4.52,-6.47 3.73,-5.74 5.26,-5.74 4.49,-5.01 6.13,-2.08 9.33,-2.06 9.02,-1.64 6.19,-0.78 6.73,-0.5
BACK_LED: 
BOOT0: 
BST1: 
BST1-1: 
BST2: 
BST2-1.: 
BST3: 
BUTTON: 
CC1-1: 
CC1-2: 
CC1-3: 
CC1_1: 
CC1_2: 
CC1_3: 
CC1_4: 
CC2-1: 
CC2-2: 
CC2-3: 
CC2_1: 
CC2_2: 
CC2_3: 
CC2_4: 
COMP: 
COMP1: 
CSN: C22.1 R17.2 R22.2 R45.2 U4.5 U6.3 | length 99.2
  Top Layer w0.2: U4.5@7.174,-5.982 9.078,-4.078 C22.1@9.078,-3.901 9.078,-3.132 9.998,-2.212 v1(10.122,-2.212) ; v1(43.094,-6.91) 43.1,-6.916 R17.2@43.1,-7.968 ; R22.2@44.45,-10.4 44.45,-11.35 44.733,-11.633 v1(45.045,-11.633) ; R45.2@45.79,-7.968 45.876,-7.882 v1(45.876,-6.969) ; v1(58.01,-4.09) 58.03,-4.07 U6.3@58.03,-3.315
  Mid-Layer 2 w0.15: v1(10.122,-2.212) 10.13,-2.212 10.385,-2.467 10.838,-2.467 ; v1(43.094,-6.91) 42.874,-6.69 41.96,-6.69 39.37,-4.1 28.883,-4.1 28.003,-3.22 11.11,-3.22 10.838,-2.948 10.838,-2.467 ; v1(45.045,-11.633) 45.045,-9.485 49.169,-5.361 56.739,-5.361 v1(58.01,-4.09) ; v1(45.876,-6.969) 45.811,-6.969 45.613,-6.77 45.136,-6.77 43.666,-5.3 42.013,-5.3 40.203,-3.49 29.122,-3.49 28.252,-2.62 11.93,-2.62 11.58,-2.27 11.035,-2.27 10.838,-2.467
CSP2: C20.1 R17.1 TYPE_C3. TYPE_C3.A1 TYPE_C3.A12 TYPE_C3.B1 TYPE_C3.B12 U4.2 | length 51.8
  Top Layer w0.2: U4.2@8.023,-6.831 8.134,-6.72 9.368,-6.72 9.82,-6.268 9.82,-4.719 C20.1@9.858,-4.681 9.858,-4.539 9.823,-4.504 9.858,-4.469 9.858,-3.903 11.011,-2.75 11.378,-2.75 v1(11.383,-2.745) ; v1(43.1,-6.21) R17.1@43.1,-5.118
  Mid-Layer 2 w0.15: v1(11.383,-2.745) 11.558,-2.92 28.128,-2.92 28.998,-3.79 39.484,-3.79 42.084,-6.39 42.92,-6.39 v1(43.1,-6.21)
  Mid-Layer 2 w0.5: TYPE_C3.@36.795,-12.07 36.795,-12.385 37.74,-13.33 39.405,-13.33 TYPE_C3.B12@39.415,-13.32 40.27,-13.32 40.655,-12.935 TYPE_C3.@40.655,-12.07 TYPE_C3.@40.655,-8.07
  Bottom Layer w0.5: TYPE_C3.A1@38.025,-13.32 TYPE_C3.B12@39.415,-13.32
CSP3: C69.1 R45.1 U4.51 USBA1.4 | length 45.5
  Top Layer w0.15: U4.51@8.023,-8.245 8.208,-8.43 8.68,-8.43 9.65,-7.46 9.65,-6.897 10.68,-5.867 C69.1@10.68,-5.635 ; C69.1@10.642,-5.458 10.899,-5.715 11.43,-5.715 12.24,-4.905 12.24,-3.43 13.131,-2.539 v1(13.131,-2.145)
  Top Layer w0.2: C69.1@10.642,-5.458 10.642,-5.6 C69.1@10.677,-5.635 ; R45.1@45.79,-5.118 45.83,-5.158 v1(45.83,-6.27)
  Mid-Layer 2 w0.15: v1(13.131,-2.145) 13.306,-2.32 28.376,-2.32 29.246,-3.19 40.327,-3.19 42.137,-5 43.79,-5 45.26,-6.47 45.567,-6.47 45.767,-6.27 v1(45.83,-6.27)
CSP_1: 
CSP_2: 
CSP_3: 
CSP_4: 
D25_EN: 
D25_INT: 
D31_CSP1: C74.2 C82.2 L5.1 R47.2 R51.1 R53.1 | length 52.7
  Top Layer w0.2: v1(19.57,-0.9) 19.572,-0.902 19.572,-1.713 R53.1@19.575,-1.715 ; R51.1@20.677,-1.715 20.677,-0.903 v1(20.68,-0.9) ; v1(23.15,-18.59) R47.2@24.23,-18.59
  Mid-Layer 1 w0.2: v1(19.57,-0.9) 19.075,-1.395 17.36,-1.395 15.96,-2.795 15.96,-13.355 20.68,-18.075 22.657,-18.075 23.15,-18.568 v1(23.15,-18.59) ; v1(20.68,-0.9) 19.85,-1.73 17.51,-1.73 16.3,-2.94 16.3,-13.18 20.79,-17.67 23.1,-17.67 23.84,-18.41 v1(23.84,-18.86)
  Mid-Layer 2 w0.2: v1@19.563,-0.9 v1(19.57,-0.9) ; v1(23.15,-18.59) v1@23.15,-18.509
D31_CSP2: C78.2 C83.2 L6.2 R48.2 R52.1 R54.1 | length 48.2
  Top Layer w0.2: R48.2@28.59,-18.59 28.62,-18.62 v1(29.62,-18.62) ; v1@32.75,-1.24 32.773,-1.263 R54.1@32.773,-1.71 ; R52.1@33.882,-1.71 33.91,-1.682 v1(33.91,-1.25) v1@33.91,-1.24
  Mid-Layer 1 w0.2: v1(29.25,-19.41) 30.301,-19.41 30.95,-18.761 30.95,-12.91 29.34,-11.3 29.34,-2.73 30.3,-1.77 33.39,-1.77 v1(33.91,-1.25) ; v1@29.677,-18.62 v1(29.62,-18.62) 30.25,-17.99 30.25,-13.2 28.64,-11.59 28.64,-2.44 30.33,-0.75 31.025,-0.75 31.525,-1.25 v1(32.75,-1.25)
  Mid-Layer 2 w0.2: v1(29.25,-19.41) v1@29.307,-19.467 ; v1@32.669,-1.25 v1(32.75,-1.25)
D31_EN1: 
D31_EN2: 
D31_INT1: 
D31_INT2: 
D31_VOUT1: C75.2 C76.2 C77.1 Q2.D R47.1 R57.1 | length 24.3
  Top Layer w0.2: v1(17.365,-0.895) 17.365,-1.71 R57.1@17.369,-1.715 ; R47.1@21.38,-18.59 21.395,-18.575 v1(22.45,-18.575)
  Mid-Layer 1 w0.2: v1(17.365,-0.895) 15.61,-2.65 15.61,-13.5 20.685,-18.575 v1(22.45,-18.575)
  Mid-Layer 2 w0.2: v1(17.365,-0.895) v1@17.4,-0.931 ; v1@22.427,-18.552 v1(22.45,-18.575)
D31_VOUT2: C79.2 C80.2 C81.1 Q1.D R48.1 R58.1 | length 20.4
  Top Layer w0.2: v1(30.384,-18.62) 31.41,-18.62 R48.1@31.44,-18.59 ; R58.1@30.557,-1.71 v1@30.557,-1.25
  Mid-Layer 1 w0.2: v1(30.384,-18.62) 30.6,-18.404 30.6,-13.055 28.99,-11.445 28.99,-2.585 30.268,-1.307 30.503,-1.307 v1(30.56,-1.25)
DM-1: 
DM-2: 
DM-3: 
DM-4: 
DM_1: 
DM_2: 
DM_3: 
DM_4: 
DN0: ESD15.2 TYPE_C1.A7 TYPE_C1.B7 U4.43 | length 11.7
  Top Layer w0.15: U4.43@5.76,-10.508 6.625,-11.372 v2(6.737,-11.372)
  Mid-Layer 1 w0.15: TYPE_C1.A7@12.025,-9.62 12.525,-9.62 TYPE_C1.B7@13.425,-10.52
  Mid-Layer 2 w0.15: v2(9.13,-9.82) 9.13,-9.848 9.343,-10.061 11.584,-10.061 TYPE_C1.A7@12.025,-9.62
  Bottom Layer w0.15: v2(6.737,-11.372) 6.625,-11.26 6.625,-9.355 6.737,-9.243 7.315,-8.665 8.681,-8.665 9.015,-8.999 9.015,-9.115 ESD15.2@9.29,-9.39
DN1: ESD10.2 TYPE_C2.A7 TYPE_C2.B7 U4.38 | length 32.4
  Top Layer w0.15: v2(3.635,-12) 3.635,-11.219 U4.38@3.78,-11.073
  Mid-Layer 1 w0.15: TYPE_C2.A7@25,-9.62 25.9,-10.52 TYPE_C2.B7@26.4,-10.52
  Mid-Layer 2 w0.15: v2(3.635,-12) 3.668,-12.034 3.668,-12.484 8.209,-17.025 14.219,-17.025 16.154,-15.09 20.671,-15.09 22.26,-13.501 22.26,-13 22.94,-12.32 22.94,-10.1 v1(22.67,-9.83)
  Bottom Layer w0.15: ESD10.2@22.51,-9.243 22.67,-9.403 v1(22.67,-9.83) 22.73,-9.89 24.73,-9.89 TYPE_C2.A7@25,-9.62
DN2: ESD17.2 TYPE_C3.A7 TYPE_C3.B7 U4.34 | length 54.9
  Top Layer w0.15: v2(2.058,-10.705) 2.058,-10.669 2.185,-10.541 2.185,-10.405 U4.34@2.649,-9.942
  Mid-Layer 1 w0.15: TYPE_C3.A7@38.025,-9.62 38.512,-9.62 39.412,-10.52 TYPE_C3.B7@39.425,-10.52
  Mid-Layer 2 w0.15: v2(2.058,-10.705) 1.85,-10.913 1.85,-12.363 7.712,-18.225 14.716,-18.225 16.651,-16.29 21.181,-16.29 23.121,-14.35 40.635,-14.35 41.855,-13.13 41.855,-11.085 v1(42.42,-10.52)
  Bottom Layer w0.15: TYPE_C3.B7@39.425,-10.52 39.548,-10.52 39.838,-10.23 41.483,-10.23 ESD17.2@42.09,-10.837
DN3: ESD5.2 U4.28 USBA1.2 | length 62.7
  Top Layer w0.15: v2(0.591,-9.124) 0.591,-8.606 U4.28@0.952,-8.245
  Mid-Layer 2 w0.15: v2(0.591,-9.124) 0.65,-9.183 0.65,-12.86 7.215,-19.425 15.213,-19.425 17.148,-17.49 41.73,-17.49 48.955,-10.265 49.429,-10.265 USBA1.2@50.225,-11.061
  Bottom Layer w0.15: USBA1.2@50.225,-11.061 50.266,-11.02 ESD5.2@51.74,-11.02
DP0: ESD14.2 TYPE_C1.A6 TYPE_C1.B6 U4.42 | length 8.9
  Top Layer w0.15: U4.42@5.477,-10.79 6.558,-11.872 6.746,-11.872 v2(6.794,-11.919)
  Mid-Layer 2 w0.15: v2(6.794,-11.919) 7.729,-10.984 v2(9.05,-10.984)
  Bottom Layer w0.15: ESD14.2@9.565,-10.245 9.615,-10.245 9.71,-10.15 11.622,-10.15 11.991,-10.52 TYPE_C1.A6@12.025,-10.52 12.925,-9.62 TYPE_C1.B6@13.425,-9.62
DP1: ESD9.2 TYPE_C2.A6 TYPE_C2.B6 U4.41 | length 32.5
  Top Layer w0.15: v2(4.172,-12.12) 5.127,-11.165 U4.41@5.286,-11.165
  Mid-Layer 1 w0.15: TYPE_C2.A6@25,-10.52 25.62,-11.14 26.6,-11.14 26.975,-10.765 26.975,-10.195 TYPE_C2.B6@26.4,-9.62 TYPE_C2.B6@26.4,-9.707
  Mid-Layer 2 w0.15: v2(4.172,-12.12) 4.172,-12.563 8.333,-16.725 14.095,-16.725 16.03,-14.79 20.547,-14.79 21.96,-13.377 21.96,-12.876 22.411,-12.425 22.411,-11.723 22.195,-11.507 v1(22.195,-11.46)
  Bottom Layer w0.15: v1(22.195,-11.46) 22.195,-11.112 22.47,-10.837 22.513,-10.837 23.11,-10.24 24.72,-10.24 TYPE_C2.A6@25,-10.52
DP2: ESD16.2 TYPE_C3.A6 TYPE_C3.B6 U4.35 | length 54.1
  Top Layer w0.15: v2(2.278,-11.239) 2.483,-11.034 2.483,-10.678 2.932,-10.229 U4.35@2.932,-10.225
  Mid-Layer 2 w0.15: v2(2.278,-11.239) 2.15,-11.366 2.15,-12.239 7.836,-17.925 14.592,-17.925 16.527,-15.99 21.057,-15.99 22.997,-14.05 40.511,-14.05 41.555,-13.006 41.555,-10.961 41.945,-10.571 41.945,-9.767 v1(41.756,-9.578)
  Bottom Layer w0.15: TYPE_C3.A6@38.025,-10.52 38.048,-10.52 38.948,-9.62 TYPE_C3.B6@39.425,-9.62 39.647,-9.62 39.907,-9.88 41.453,-9.88 ESD16.2@41.756,-9.578
DP3: ESD4.2 U4.29 USBA1.3 | length 62
  Top Layer w0.15: v2(1.078,-9.378) 1.016,-9.316 1.016,-8.711 1.199,-8.528 U4.29@1.235,-8.528
  Mid-Layer 2 w0.15: v2(1.078,-9.378) 1.078,-9.446 0.95,-9.574 0.95,-12.736 7.339,-19.125 15.089,-19.125 17.024,-17.19 41.535,-17.19 48.81,-9.915 49.371,-9.915 USBA1.3@50.225,-9.061
  Bottom Layer w0.15: USBA1.3@50.225,-9.061 50.256,-9.03 ESD4.2@51.74,-9.03
DP-1: 
DP-2: 
DP-3: 
DP-4: 
DP_1: 
DP_2: 
DP_3: 
DP_4: 
DRV_C1: 
DRV_C2: 
DRV_C3: 
DRV_C4: 
EN1: 
EN1-1: 
EN2: 
EN-2: 
FB: pad.2@31.15,2.132 U4.3 | length 29.5
  Top Layer w0.2: U4.3@7.74,-6.548 8.218,-6.07 v1(8.359,-6.07)
  Mid-Layer 2 w0.15: v2(11.624,-1.825) 11.624,-1.866 11.998,-2.24 12.35,-2.24 13.24,-1.35 13.89,-1.35 14.26,-1.72 26.77,-1.72 27.735,-0.755 27.735,0.875 28.03,1.17 30.188,1.17 pad.2@31.15,2.132
  Bottom Layer w0.15: v1(8.359,-6.07) 8.359,-6.008 8.56,-5.807 8.56,-4.446 11.056,-1.95 11.499,-1.95 v2(11.624,-1.825)
FB11: C27.2 R20.1 R21.1 U4.50 U6.1 | length 62.5
  Top Layer w0.15: U4.50@7.74,-8.528 7.962,-8.75 8.784,-8.75 9.95,-7.584 9.95,-7.022 10.957,-6.015 11.555,-6.015 12.547,-5.022 12.547,-3.547 13.61,-2.484 13.61,-2.108 13.641,-2.077 13.641,-1.912 v1(13.708,-1.845)
  Top Layer w0.2: R21.1@58.875,-1.643 58.916,-1.601 59.329,-1.601 v1(59.37,-1.56) 59.411,-1.601 59.848,-1.601 R20.1@59.865,-1.618 ; C27.2@59.865,-0.75 R20.1@59.865,-1.618 ; U6.1@60.57,-3.315 60.57,-2.323 R20.1@59.89,-1.643 R20.1@59.865,-1.618
  Mid-Layer 2 w0.15: v1(13.708,-1.845) 13.883,-2.02 28.501,-2.02 29.371,-2.89 40.451,-2.89 42.261,-4.7 56.23,-4.7 v1(59.37,-1.56)
FB_1: 
FB_2: 
FB_3: 
FLASH_CLK: 
FLASH_CS: 
FLASH_MISO: 
FLASH_MOSI: 
G0: Q2.G U4.18 | length 25
  Top Layer w0.15: v2(2.59,-3.63) 2.59,-4.509 U4.18@2.932,-4.851
  Top Layer w0.2: v1(14.841,-14.365) 14.841,-14.446 15.102,-14.708 15.102,-14.826 Q2.G@15.255,-14.979
  Mid-Layer 2 w0.15: v2(2.59,-3.63) 2.875,-3.915 5.531,-3.915 6.698,-5.082 9.133,-5.082 9.671,-5.62 15.094,-5.62 15.868,-6.393 15.868,-12.642 14.825,-13.685 14.825,-14.349 v1(14.841,-14.365)
G1: Q1.G U4.20 | length 40.2
  Top Layer w0.15: v2(1.571,-4.012) 1.571,-4.621 U4.20@2.366,-5.416
  Top Layer w0.2: v1(29.25,-13.3) 29.495,-13.055 Q1.G@29.495,-13.019
  Mid-Layer 2 w0.15: v2(1.571,-4.012) 1.571,-3.63 1.628,-3.573 1.628,-3.571 2.318,-2.88 3.813,-2.88 4.548,-3.615 5.656,-3.615 6.823,-4.782 9.257,-4.782 9.795,-5.32 15.219,-5.32 16.373,-6.475 20.417,-6.475 21.572,-5.32 27.134,-5.32 27.821,-6.008 28.57,-6.756 28.57,-9.993 30.44,-11.863 30.44,-12.11 v1(29.25,-13.3)
G2: Q3.G U4.22 | length 45.6
  Top Layer w0.15: 0.871,-5.053 U4.22@1.8,-5.982
  Top Layer w0.2: v1(33.59,-13.06) 33.861,-13.331 33.861,-14.851 Q3.G@34.128,-15.117
  Mid-Layer 2 w0.15: v2(0.823,-4.846) 0.823,-4.779 0.698,-4.654 0.698,-3.651 2.07,-2.28 4.062,-2.28 4.797,-3.015 5.904,-3.015 7.071,-4.182 9.506,-4.182 10.044,-4.72 15.467,-4.72 16.622,-5.875 20.169,-5.875 21.323,-4.72 27.382,-4.72 28.07,-5.408 29.17,-6.508 29.17,-9.74 32.24,-12.81 33.327,-12.81 33.577,-13.06 v1(33.59,-13.06)
G3: Q4.G U4.24 | length 70.1
  Top Layer w0.15: v2(0.599,-5.948) 0.635,-5.948 U4.24@1.235,-6.548
  Top Layer w0.2: v1(55.79,-14.88) 55.954,-14.716 Q4.G@56.248,-14.716
  Mid-Layer 2 w0.15: v2(6.87,-19.86) 6.87,-19.911 v2@6.918,-19.959 ; v2@6.87,-19.837 6.918,-19.884 v2@6.918,-19.959 ; v1(55.79,-14.88) 55.54,-15.13 48.516,-15.13 43.706,-19.94 7.941,-19.94 7.596,-20.285 7.244,-20.285 v2@6.918,-19.959
  Bottom Layer w0.15: v2(0.599,-5.948) 0.635,-5.948 1.46,-6.773 1.46,-8.149 4.9,-11.589 4.9,-14.219 7.686,-17.005 7.686,-18.993 6.87,-19.808 v2(6.87,-19.86)